# Altium PCB Stepper Base.PcbDoc
Units mm, origin at the board's own origin, x right, y up, seen from the top; angles counter-clockwise.
Board outline 41.75 x 26 mm, 2 copper layers (Top Layer, Bottom Layer); 8 components, 12 nets, 34 pads, 0 vias.
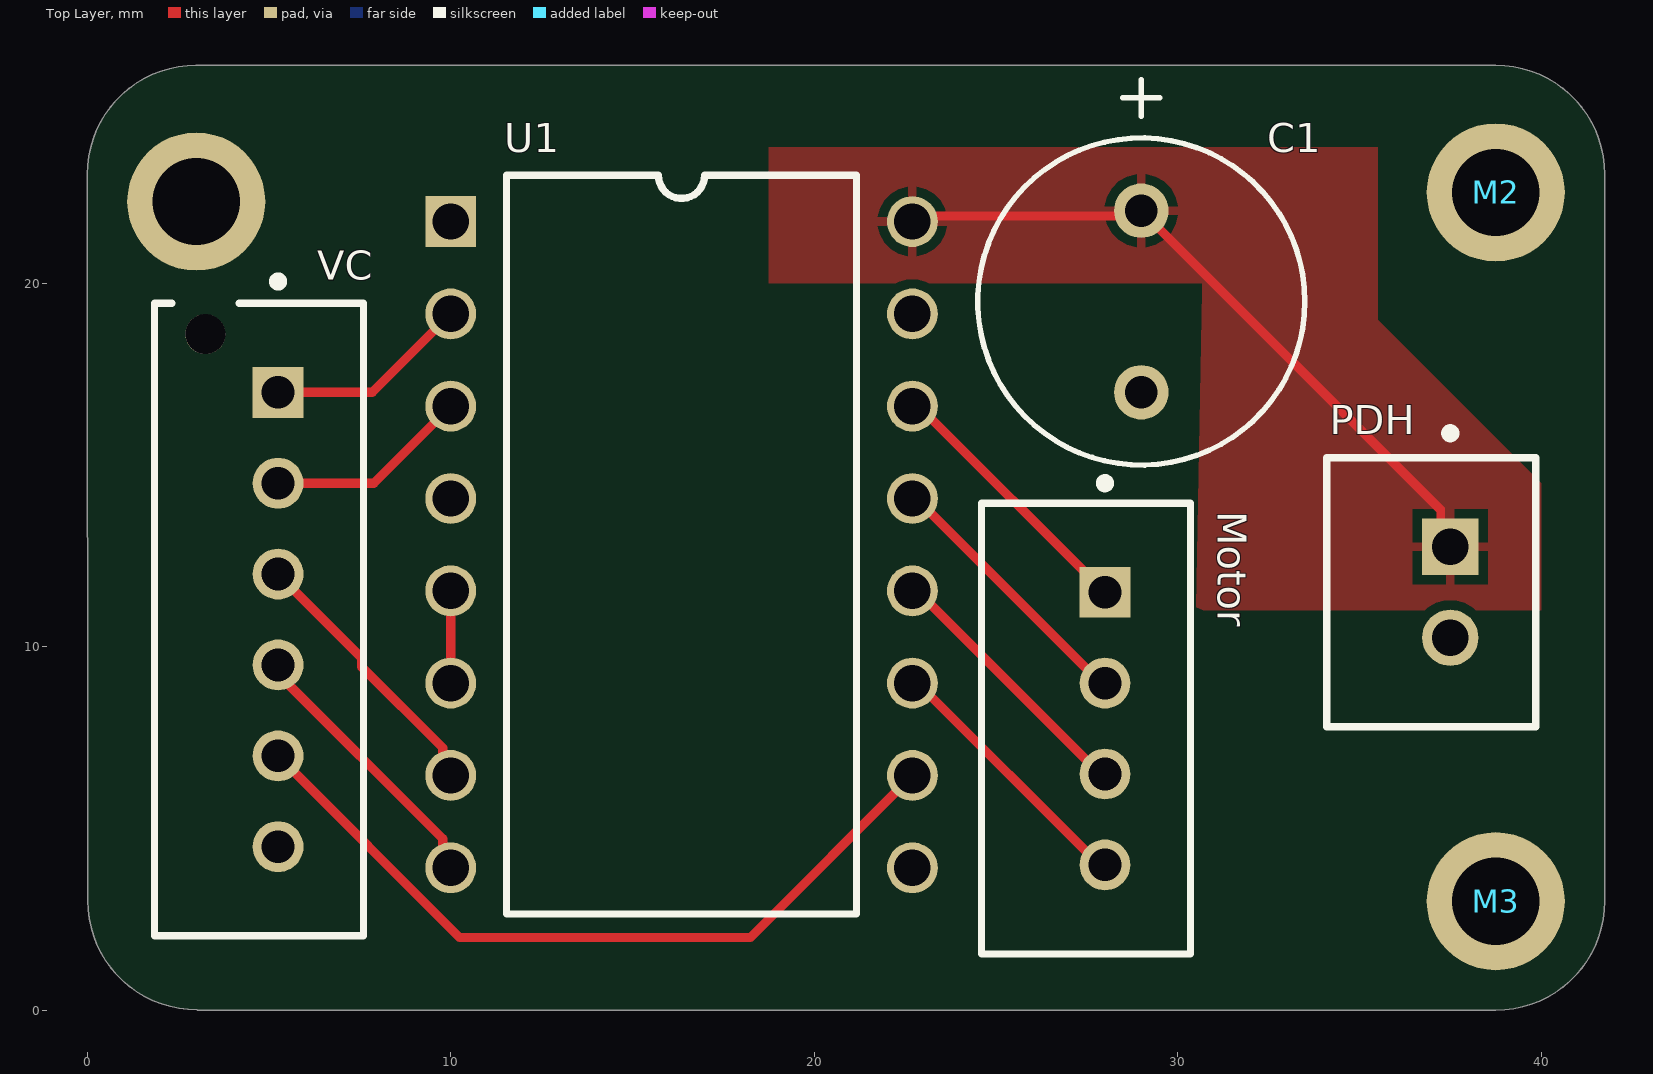
[diagram p0: Top Layer view]
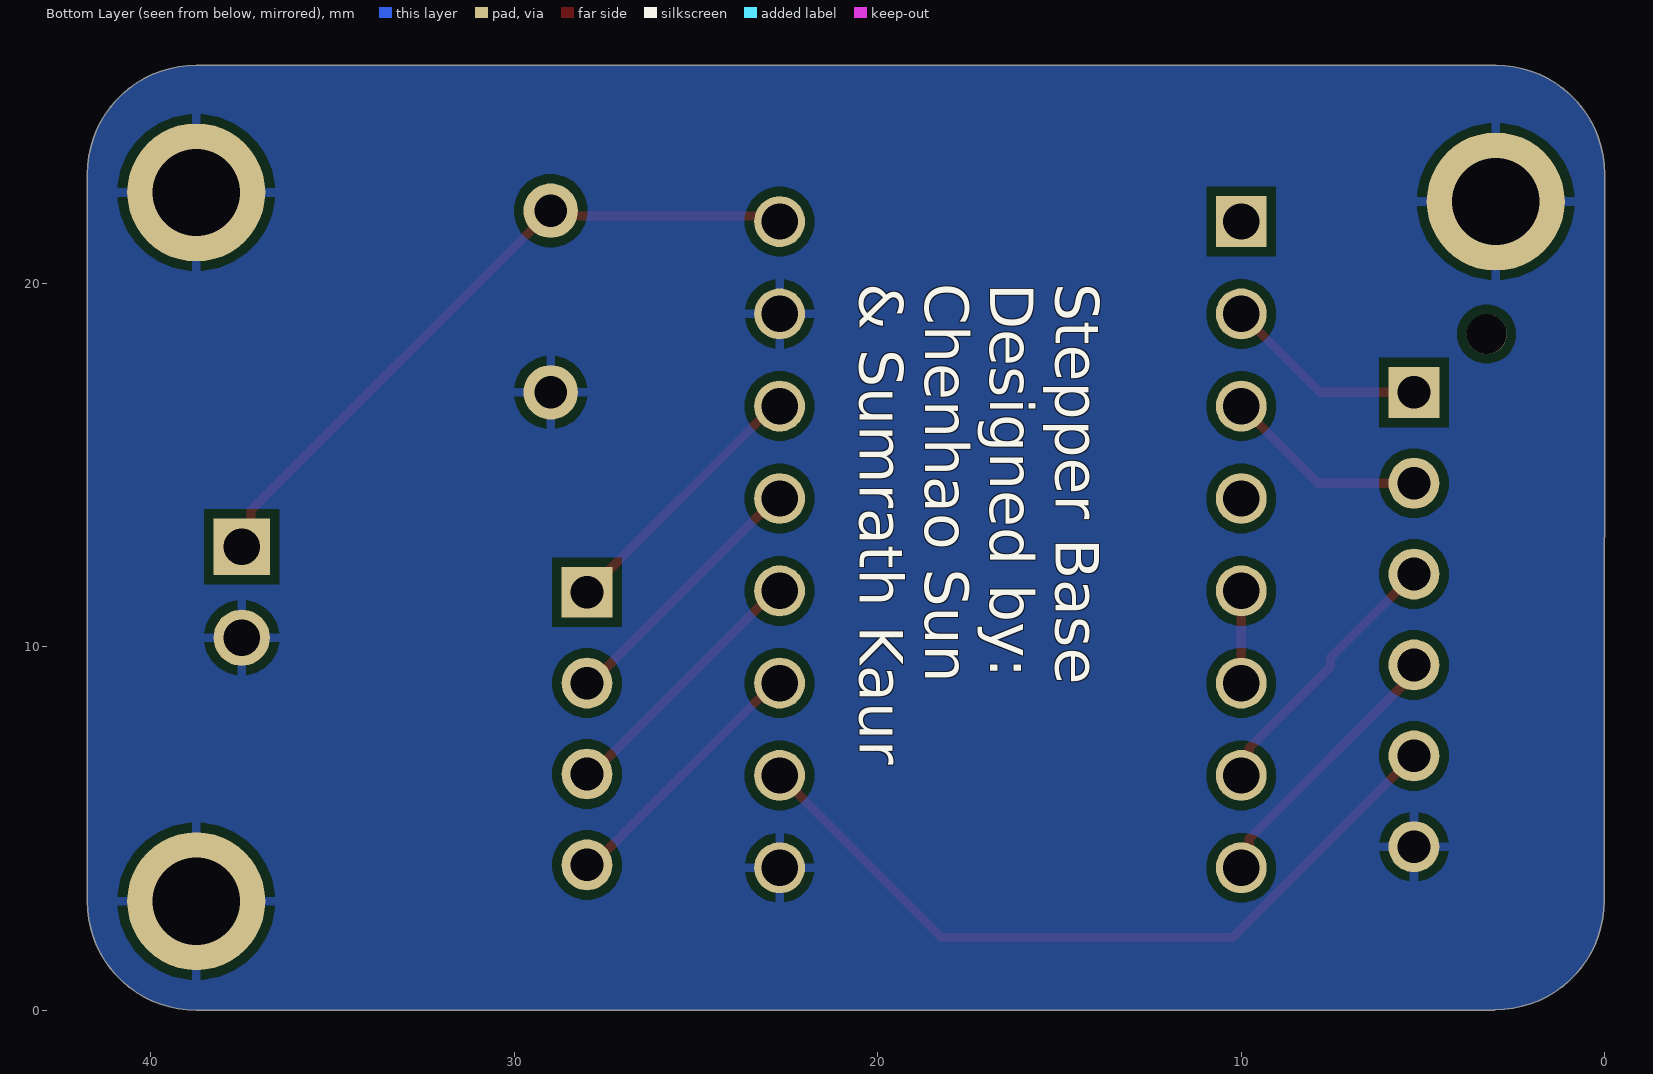
[diagram p1: Bottom Layer view, seen from below]
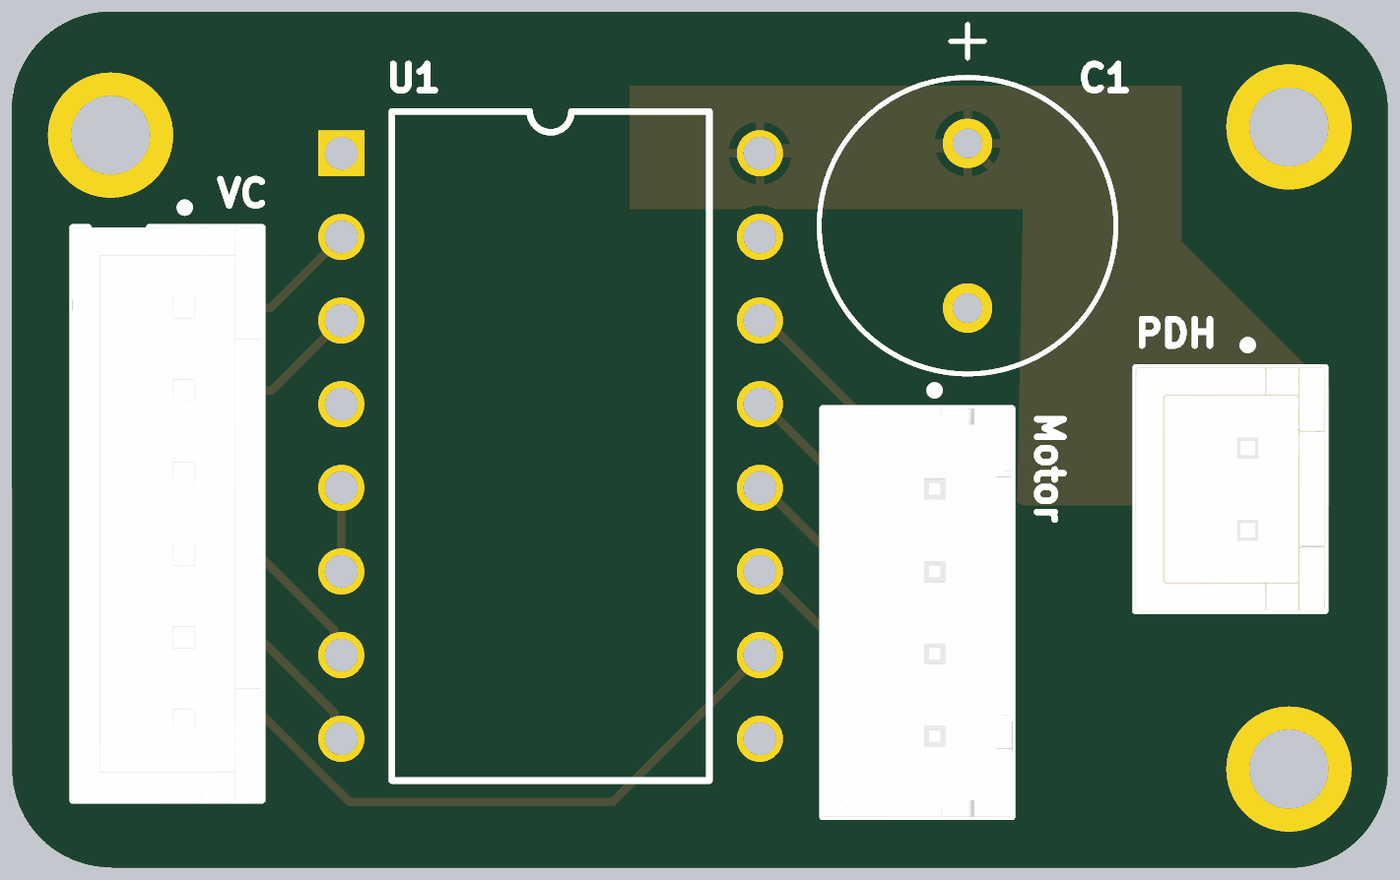
[diagram p2: 3D render of the assembled board from above, using the file's embedded part models]

## Layer stack, top to bottom
Top Solder: solder mask 0.0102, Solder Resist, Dk 3.5
Top Layer: signal copper 0.018
Dielectric 1: dielectric 0.32, FR-4, Dk 4.8
Bottom Layer: signal copper 0.018
Bottom Solder: solder mask 0.0102, Solder Resist, Dk 3.5

## Board outline
0.019,3.019 0,23 cw(c3,23) 3,26 38.75,26 cw(c38.75,23) 41.75,23 41.75,3 cw(c38.75,3) 38.75,0 3.038,0 3.019,0.019 cw(c3,3)

## Design rules (kind name [scope] priority, off if disabled: settings)
Clearance [All] p1: gap=0.254 ignorepadtopadclearanceinfootprint=FALSE
PolygonConnect [All] p1: connectstyle=Relief reliefconductorwidth=0.254 reliefentries=4 polygonreliefangle="90 Angle" airgapwidth=0.254
RoutingVias [All] p1: holewidth=0.711 width=1.27 viastyle="Through Hole" minholewidth=0.711 minwidth=1.27 maxholewidth=0.711 maxwidth=1.27
SolderMaskExpansion [All] p1: expansion=0 istentingtop=FALSE
Width [All] p1: maxlimit=0.254 minlimit=0.254 preferedwidth=0.254
30 further rules are at their usual default settings.

## Classes and differential pairs
component class "Top Level": MOTOR PDH U1 VC

## Components (designator, comment, footprint, x,y, rotation, side; value= is the part's Value field where it differs from the comment)
C1 "470 uF" "electrolytic cap" 29,22 r270 top
M1 "M2 Mounting Hole" "M2 Mounting Hole" 3,22.25 r0 top
M2 "M2 Mounting Hole" "M2 Mounting Hole" 38.75,22.5 r0 top
M3 "M2 Mounting Hole" "M2 Mounting Hole" 38.75,3 r0 top
Motor "Motor" FP-B4B-XH-A_LF_SN-MFG 27.475,7.75 r90 top (schematic designator J2)
PDH "PDH" FP-B2B-XH-A_LF_SN-MFG 36.975,11.5 r270 top (schematic designator J3)
U1 "DRV885" DRV588 10,21.7 r0 top
VC "VC" FP-B6B-XH-AM_LF_SN-MFG 4.725,10.75 r90 top (schematic designator J1)

## Footprints (in the part's own frame and the unit in brackets; to place one, negate y for a bottom-side part, rotate by r counter-clockwise, add the part's x,y. Pads: shape width x height; smd on the part's side, far side on the other; paste and mask are expansions set on the pad)
DRV588 [mm]
  rect 1.4x1.4 hole 1: 1(0,0)
  round 1.4 hole 1: 2(0,-2.54) 3(0,-5.08) 4(0,-7.62) 5(0,-10.16) 6(0,-12.7) 7(0,-15.24) 8(0,-17.78) 9(12.7,-17.78) 10(12.7,-15.24) 11(12.7,-12.7) 12(12.7,-10.16) 13(12.7,-7.62) 14(12.7,-5.08) 15(12.7,-2.54) 16(12.7,0)
  silkscreen extent 1.53,-19.05 11.17,1.27
"electrolytic cap" [mm]
  round 1.5 hole 0.9: 1(0,0) 2(5,0)
  silkscreen extent -3.61,-4.5 7,4.5
FP-B2B-XH-A_LF_SN-MFG [mm]
  rect 1.55x1.55 hole 1 paste-2539.97 mask+0: 1(-1.25,0.525)
  round 1.55 hole 1 paste-2539.97 mask+0: 2(1.25,0.525)
  silkscreen extent -4.5,-2.88 3.7,2.88, body extent -3.8,-2.98 3.8,2.98, height 0.25
FP-B4B-XH-A_LF_SN-MFG [mm]
  rect 1.4x1.4 hole 0.9 paste-2539.97 mask+0: 1(3.75,-0.525)
  round 1.4 hole 0.9 paste-2539.97 mask+0: 2(1.25,-0.525) 3(-1.25,-0.525) 4(-3.75,-0.525)
  silkscreen extent -6.2,-2.88 6.87,2.88, body extent -6.3,-2.98 6.3,2.98, height 0.25
FP-B6B-XH-AM_LF_SN-MFG [mm]
  rect 1.4x1.4 hole 0.9 paste-2539.97 mask+0: 1(6.25,-0.525)
  round 1.4 hole 0.9 paste-2539.97 mask+0: 2(3.75,-0.525) 3(1.25,-0.525) 4(-1.25,-0.525) 5(-3.75,-0.525) 6(-6.25,-0.525)
  round 1.1 hole 1.1 unplated paste-2539.97 mask+0: ""(7.85,1.475)
  silkscreen extent -8.7,-2.88 9.42,2.88, body extent -8.8,-2.98 8.8,2.98, height 0.25
"M2 Mounting Hole" [mm]
  round 3.8 hole 2.4: 1(0,0)

## Part data
C1: library part "electrolytic cap"
Motor: library part CMP-17439-000250-1, "CONN HEADER VERT 4POS 2.5MM", Color=Natural, Contact Resistance=20mR, Current Rating=3A, Flammability Rating="UL94 V-0", Housing Color=White, Insulation Resistance=1GR, Max Operating Temperature=85°C, Max Voltage Rating (AC)=250V, Min Operating Temperature=-25°C, Package Quantity=500, Connector Type=Header, Contact Finish - Mating=TIN, Contact Material=Brass, Contact Plating=Tin, Contact Shape=Square, Contact Type="Male Pin", Depth=5.75mm, Fastening Type=Detent, Gender=Male, Housing Material=Polyamide, Insulation Color=Natural, Insulation Material=Nylon, Lead Free="Lead Free", Lead Pitch=2.5mm, Length=12.4mm, Mated Stacking Heights=9.8mm, Material=Polyamide, Max Current Rating=3A, Max Voltage Rating (DC)=250V, Mount="Through Hole", Number of Contacts=4, Number of Positions=4, Number of Rows=1, Orientation=Straight, Packaging=Bulk, Pitch=2.5mm, REACH SVHC="No SVHC", Series=XH, Termination=Solder, Voltage Rating=250V, Voltage Rating (AC)=250V, Wire/Cable Gauge=22AWG
PDH: library part CMP-2000-05888-3, "CONN HEADER VERT 2POS 2.5MM", Color=Natural, Contact Resistance=20mR, Current Rating=3A, Housing Color=White, Insulation Resistance=1GR, Max Operating Temperature=85°C, Max Voltage Rating (AC)=250V, Min Operating Temperature=-25°C, Connector Type="Male Pin", Contact Material=Brass, Contact Plating=Tin, Contact Type="Male Pin", Depth=5.75mm, Fastening Type=Detent, Housing Material=Polyamide, Lead Free="Lead Free", Lead Pitch=2.5mm, Length=7.4mm, Max Current Rating=3A, Max Voltage Rating (DC)=250V, Mount="Through Hole", Number of Contacts=2, Number of Positions=2, Number of Rows=1, Orientation=Straight, Packaging=Bulk, Pitch=2.5mm, REACH SVHC="No SVHC", Series=XH, Termination=Solder, Voltage Rating=250V, Voltage Rating (AC)=250V, Wire/Cable Gauge=22AWG
U1: library part "DRV885 Module"
VC: library part CMP-17439-000167-1, "CONN HEADER VERT 6POS 2.5MM", Current Rating=3A, Flammability Rating="UL94 V-0", Insulation Color=Natural, Max Operating Temperature=85°C, Min Operating Temperature=-25°C, Voltage Rating=250V, Connector Type=Header, Contact Finish - Mating=TIN, Contact Material=Brass, Contact Plating=Copper, Contact Shape=Square, Contact Type="Male Pin", Fastening Type=Detent, Height=7mm, Insulation Material=Nylon, Length=17.4mm, Mated Stacking Heights=9.8mm, Mount="Through Hole", Number of Pins=6, Number of Poles=6, Number of Positions=6, Number of Rows=1, Packaging=Bulk, Pitch=2.5mm, Series=XH, Shape=Straight, Termination=Press-Fit, Width=5.75mm

## Nets (pads, with @x,y where several pads share a name; then routed paths per layer and width w, separated by ;. In a path a pad name is that pad's centre, name@x,y a point inside that pad or via, vN(x,y) a via of type N, cw(c..) or ccw(c..) an arc to the next point about the centre after c; other vN are vias at no path point)
3V3: U1.10 VC.5 | length 21.4
  Top Layer w0.254: VC.5 10.25,2 18.24,2 U1.10
12V: C1.1 PDH.1 U1.16 | length 19.2
  Top Layer w0.254: U1.16 22.85,21.85 28.85,21.85 C1.1 37.243,13.757 37.243,13.007 PDH.1
A1: Motor.3 U1.12 | length 7.4
  Top Layer w0.254: U1.12 22.83,11.54 27.87,6.5 Motor.3
A2: Motor.4 U1.11 | length 7.4
  Top Layer w0.254: U1.11 22.85,9 27.85,4 Motor.4
B1: Motor.2 U1.13 | length 7.4
  Top Layer w0.254: U1.13 22.81,14.08 27.89,9 Motor.2
B2: Motor.1 U1.14 | length 7.4
  Top Layer w0.254: U1.14 22.88,16.62 Motor.1
DIR: U1.8 VC.4 | length 7.5
  Top Layer w0.254: VC.4 5.25,9.25 9.781,4.719 9.781,4.139 U1.8
GND: C1.2 M1.1 M2.1 M3.1 PDH.2 U1.9 U1.15 VC.6
M0: U1.2 VC.1 | length 5.6
  Top Layer w0.254: VC.1 7.84,17 U1.2
M1: U1.3 VC.2 | length 5.6
  Top Layer w0.254: VC.2 7.88,14.5 U1.3
NetU1_5: U1.5 U1.6 | length 2.5
  Top Layer w0.254: U1.6 U1.5
STEP: U1.7 VC.3 | length 7.5
  Top Layer w0.254: VC.3 7.547,9.703 7.547,9.453 9.781,7.219 9.781,6.679 U1.7
pads on no net: U1.1 U1.4 VC.

## Polygon pours and split planes (outlines as drawn)
GND on Bottom Layer "GND_L02_P000" (solid, pour order 0): 0.019,3.019 0,23 cw(c3,23) 3,26 38.75,26 cw(c38.75,23) 41.75,23 41.75,3 cw(c38.75,3) 38.75,0 3.038,0 3.019,0.019 cw(c3,3)
12V on Top Layer "12V_L01_P004" (solid, pour order 4): 29.75,23.75 35.5,23.75 35.5,18
12V on Top Layer "12V_L01_P003" (solid, remove dead copper, pour order 3): 30.75,23.75 40,14.5 40,11 30.75,11 30.5,10.75
12V on Top Layer "12V_L01_P002" (solid, remove dead copper, pour order 2): 18.75,23.75 30.75,23.75 30.75,20 18.75,20

## Silkscreen, mask and mechanical layers (free items; w line width, h text height)
Bottom Overlay:
  text "Stepper Base / Designed by: / Chenhao Sun  / & Sumrath Kaur" at 20.5,20 h1.2 r90
Board Shape:
  lines w0.254: 0,3 0,23 cw(c3,23) 3,26 38.75,26 cw(c38.75,23) 41.75,23 41.75,3 cw(c38.75,3) 38.75,0 3.038,0 ; 0.019,3.019 ccw(c3,3) 3.019,0.019